# Altium PCB MCD_Board.PcbDoc (part 2 of 2)
Units mil, origin at the board's own origin, x right, y up, seen from the top; angles counter-clockwise.
Board outline 1574.8 x 1574.8 mil, 2 copper layers (Top Layer, Bottom Layer); 91 components, 65 nets, 283 pads, 76 vias.
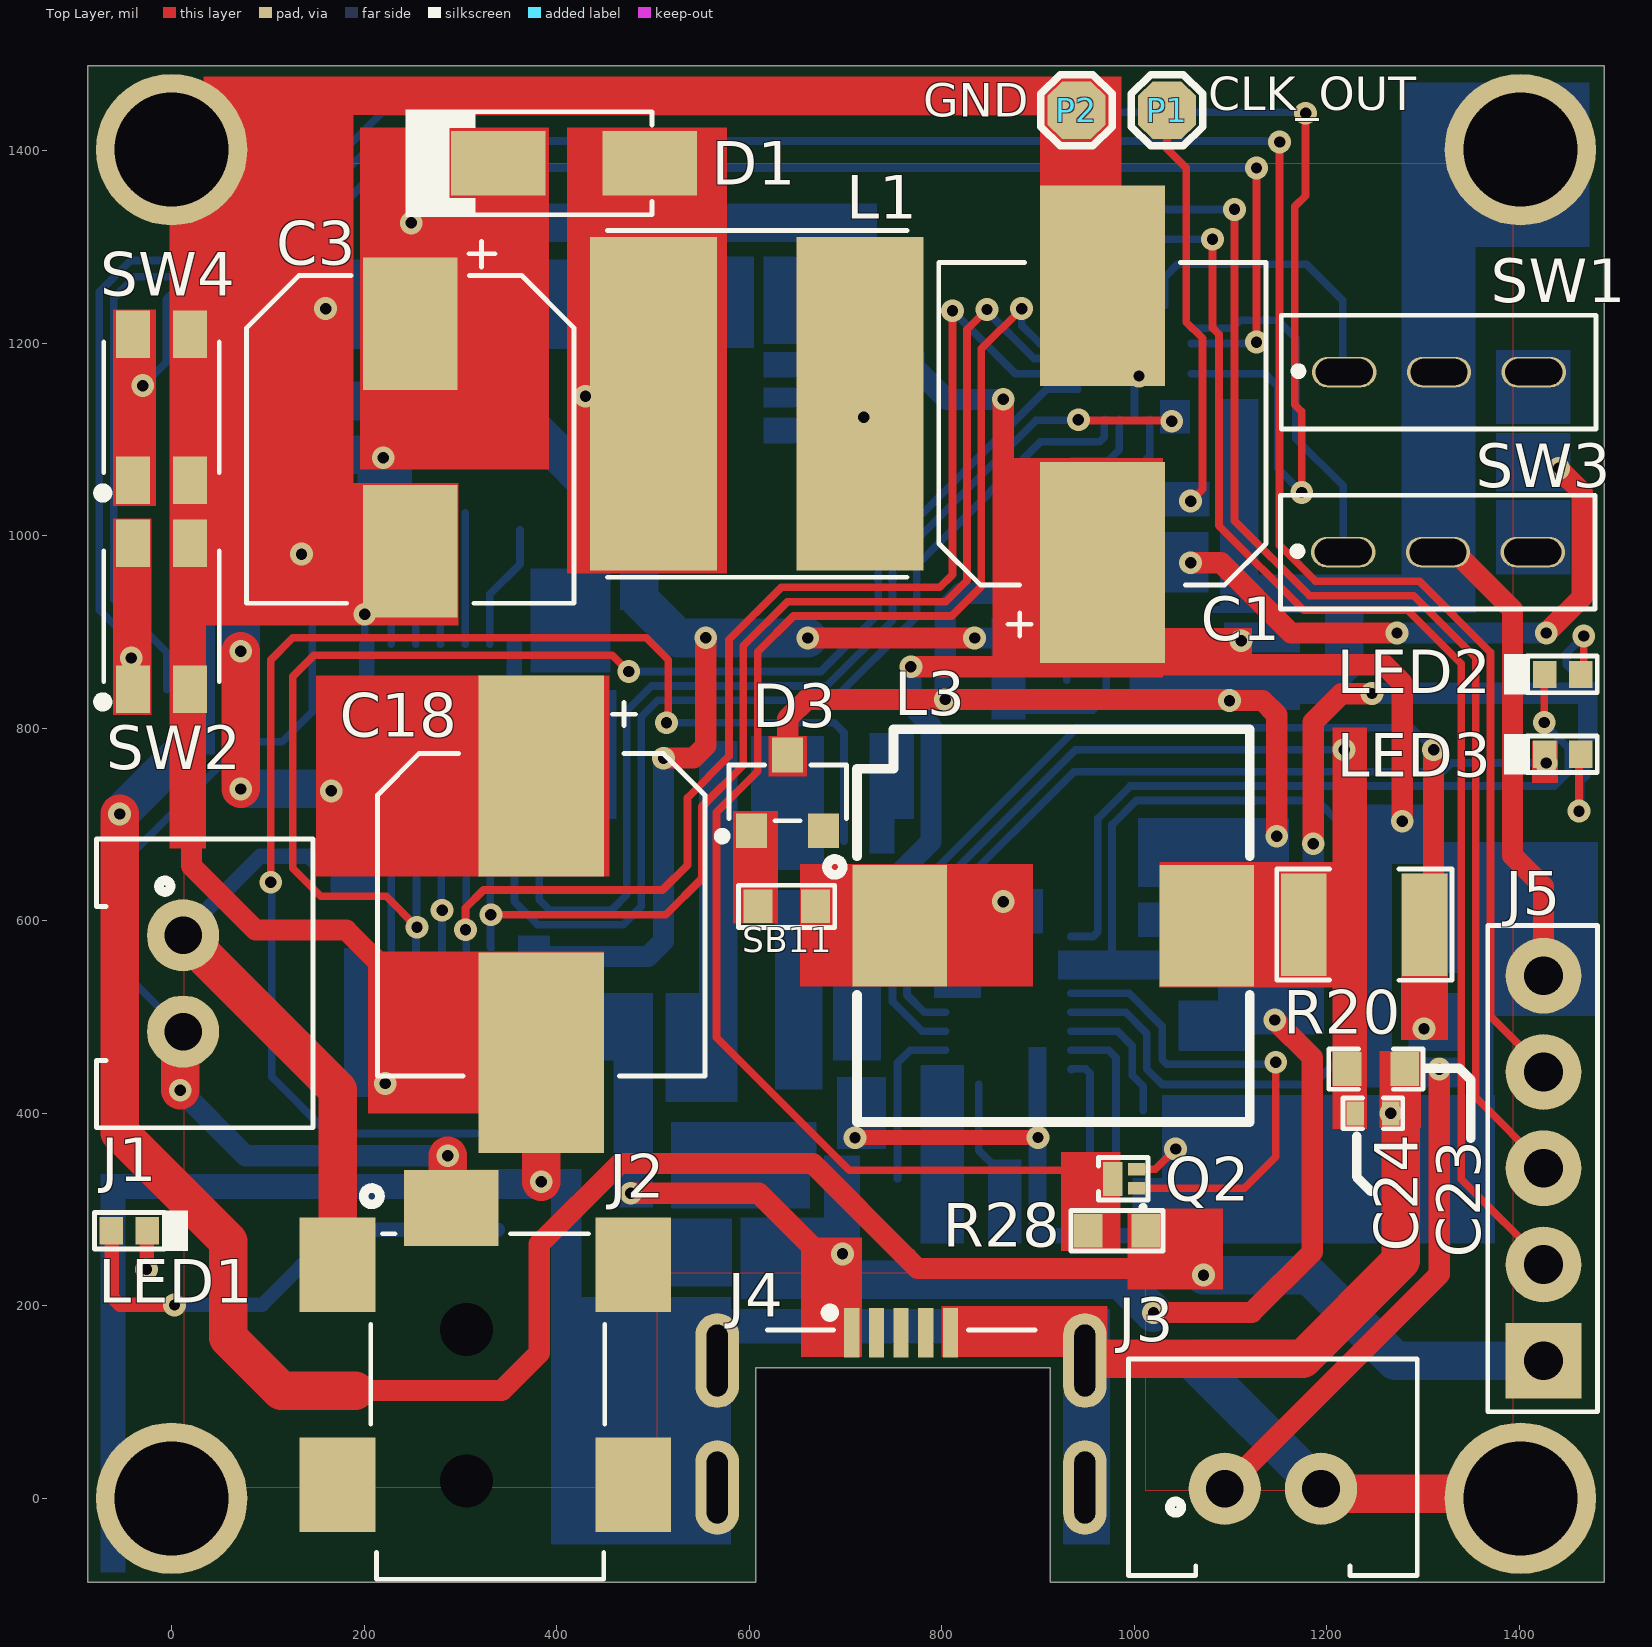
[diagram p0: Top Layer view]

## Part data (continued)
R10 R11: library part RC0402FR-071ML, "RES SMD 1M OHM 1% 1/16W 0402", Case Code (Imperial)=0402, Case Code (Metric)=1005, Manufacturer=Yageo, Max Operating Temperature=155°C, Min Operating Temperature=-55°C, Power Rating=63mW, Resistance=1MR, Supplier Part Number 1=311-1.00MLRCT-ND, Temperature Coefficient=100ppm/°C, Tolerance=1%, Voltage Rating=50V, Case/Package=0402, ComponentLink1Description=http://www.farnell.com/datasheets/1018594.pdf?src-supplier=Element14, ComponentLink1URL=http://www.farnell.com/datasheets/1018594.pdf?src-supplier=Element14, ComponentLink2Description=http://www.yageo.com/documents/recent/PYu-RC0402_51_RoHS_L_6_r.pdf?src-supplier=Future+Electronics, ComponentLink2URL=http://www.yageo.com/documents/recent/PYu-RC0402_51_RoHS_L_6_r.pdf?src-supplier=Future+Electronics, ComponentLink3Description=http://www.farnell.com/datasheets/2167052.pdf?src-supplier=Element14, ComponentLink3URL=http://www.farnell.com/datasheets/2167052.pdf?src-supplier=Element14, Composition="Thick Film", Depth=0.5mm, Height=0.32mm, Lead Free="Lead Free", Length=1mm, Manufacturer Part Number=RC0402FR-071ML, Military Standard=Not, Packaging="Tape and Reel", Pricing 1="1=0.1, 10=0.016, 100=0.0064, 1000=0.00289, 2500=0.00251, 5000=0.00207 (USD)", REACH SVHC=Unknown, Stock 1=3330803, Supplier 1=Digi-Key, Termination=SMD/SMT
R12: library part RC0402FR-072KL, "RES SMD 2K OHM 1% 1/16W 0402", Case Code (Imperial)=0402, Case Code (Metric)=1005, Manufacturer=Yageo, Max Operating Temperature=155°C, Max Power Dissipation=63mW, Min Operating Temperature=-55°C, Package Quantity=1, Resistance=2kR, Supplier Part Number 1=311-2KLRCT-ND, Temperature Coefficient=100ppm/°C, Tolerance=1%, Voltage Rating=50V, Case/Package=0402, ComponentLink1Description=http://www.yageo.com/documents/recent/PYu-RC_Group_51_RoHS_L_10.pdf?src-supplier=Digi-Key, ComponentLink1URL=http://www.yageo.com/documents/recent/PYu-RC_Group_51_RoHS_L_10.pdf?src-supplier=Digi-Key, ComponentLink2Description=http://documents.rs-components.com/techlib://itc_doclist_GB.htm?stockno=6186510&src-supplier=RSComponents, ComponentLink2URL=http://documents.rs-components.com/techlib://itc_doclist_GB.htm?stockno=6186510&src-supplier=RSComponents, ComponentLink3Description=https://www.verical.com/server-webapp/html/getDatasheet?partID=358921&src-supplier=Verical, ComponentLink3URL=https://www.verical.com/server-webapp/html/getDatasheet?partID=358921&src-supplier=Verical, ComponentLink4Description=http://www.mouser.com/ds/2/447/PYu-RC0402_51_RoHS_L_6_r-8721.pdf?src-supplier=Mouser, ComponentLink4URL=http://www.mouser.com/ds/2/447/PYu-RC0402_51_RoHS_L_6_r-8721.pdf?src-supplier=Mouser, ComponentLink5Description=http://www.farnell.com/datasheets/1018594.pdf?src-supplier=Element14, ComponentLink5URL=http://www.farnell.com/datasheets/1018594.pdf?src-supplier=Element14, ComponentLink6Description=http://www.farnell.com/datasheets/2167052.pdf?src-supplier=Element14, ComponentLink6URL=http://www.farnell.com/datasheets/2167052.pdf?src-supplier=Element14, Composition="Thick Film", Depth=0.5mm, Features="Moisture Resistant", Height=0.016inch, Lead Free="Lead Free", Length=1mm, Manufacturer Part Number=RC0402FR-072KL, Military Standard=Not, Number of Terminations=2, Packaging="Tape and Reel", Power Rating=63mW, Pricing 1="1=0.1, 10=0.016, 100=0.0064, 1000=0.00289, 2500=0.00251, 5000=0.00207 (USD)", REACH SVHC=Unknown, Stock 1=4877389, Supplier 1=Digi-Key, Termination=SMD/SMT, Voltage Rating (DC)=50V, Width=0.02inch, Working Voltage=50V
R13: library part AC0603DR-079K31L, "RES SMD  0603 9.31kOhm 0.5% Paper T/R", Manufacturer=Yageo, Category=Resistors, Manufacturer Part Number=AC0603DR-079K31L, Pricing 1="5000=0.00314, 10000=0.00309, 20000=0.00300 (USD)", RoHS=Yes, RoHS Compliant=Yes, Supplier 1=Avnet, Supplier Part Number 1=AC0603DR-079K31L
R14: library part RC0603FR-07442KL, "RES SMD 442000Ω ± 1.00% 0.1W ± 100ppm/℃ 0603", Case Code (Imperial)=0603, Case Code (Metric)=1608, Manufacturer=Yageo, Max Operating Temperature=155°C, Max Power Dissipation=100mW, Min Operating Temperature=-55°C, Package Quantity=1, Resistance=442kR, Resistor Type="Thick Film", Temperature Coefficient=100ppm/°C, Tolerance=1%, Voltage Rating=50V, Case/Package=0603, Category="Chip SMD Resistors", ComponentLink1Description=https://datasheet.ciiva.com/2455/pyu-r-int-thick-7-2455156.pdf?src-supplier=Digi-Key, ComponentLink1URL=https://datasheet.ciiva.com/2455/pyu-r-int-thick-7-2455156.pdf?src-supplier=Digi-Key, ComponentLink2Description=https://datasheet.ciiva.com/2455/pyu-r-int-thick-7-2455157.pdf?src-supplier=Digi-Key, ComponentLink2URL=https://datasheet.ciiva.com/2455/pyu-r-int-thick-7-2455157.pdf?src-supplier=Digi-Key, ComponentLink3Description=https://datasheet.ciiva.com/2455/pyu-r-int-thick-7-2455155.pdf?src-supplier=Digi-Key, ComponentLink3URL=https://datasheet.ciiva.com/2455/pyu-r-int-thick-7-2455155.pdf?src-supplier=Digi-Key, ComponentLink4Description=https://datasheet.ciiva.com/12558/rc0603-272842-12558427.pdf?src-supplier=Mouser, ComponentLink4URL=https://datasheet.ciiva.com/12558/rc0603-272842-12558427.pdf?src-supplier=Mouser, Construction=Rectangular, Depth=0.8mm, Features="Moisture Resistant", Height=0.022inch, Lead Free="Lead Free", Length=1.6mm, Manufacturer Part Number=RC0603FR-07442KL, Military Standard=Not, Number of Terminations=2, Packaging="Tape and Reel", Power Rating=100mW, Pricing 1="1=0.05220, 10=0.01890, 25=0.01870, 100=0.00820, 250=0.00770, 500=0.00760, 1000=0.00390 (USD)", RoHS=Yes, RoHS Compliant=Yes, Series=RC, Size Code=0603, Stock 1=1267, Supplier 1="Arrow Electronics", Supplier Part Number 1=RC0603FR-07442KL, Termination=SMD/SMT, Voltage Rating (DC)=50V, Width=0.031inch
R15 R16 R25 R27: library part RMCF0201FT1K50, "RES SMD 1.5K OHM 1% 1/20W 0201", Case Code (Imperial)=0201, Case Code (Metric)=0603, Manufacturer="Stackpole Electronics", Max Operating Temperature=125°C, Max Power Dissipation=50mW, Min Operating Temperature=-55°C, Resistance=1.5kR, Resistor Type="Thick Film", Supplier Part Number 1=RMCF0201FT1K50CT-ND, Temperature Coefficient=200ppm/°C, Tolerance=1%, Case/Package=0201, Category="Chip SMD Resistors", ComponentLink1Description=https://www.seielect.com/Catalog/SEI-RMCF_RMCP.pdf?src-supplier=Digi-Key, ComponentLink1URL=https://www.seielect.com/Catalog/SEI-RMCF_RMCP.pdf?src-supplier=Digi-Key, ComponentLink2Description=https://www.seielect.com/catalog/SEI-Packaging.pdf?src-supplier=Digi-Key, ComponentLink2URL=https://www.seielect.com/catalog/SEI-Packaging.pdf?src-supplier=Digi-Key, ComponentLink3Description=https://www.seielect.com/catalog/SEI-RMCF_RMCP.pdf?src-supplier=Avnet, ComponentLink3URL=https://www.seielect.com/catalog/SEI-RMCF_RMCP.pdf?src-supplier=Avnet, Contact Plating=Tin,Matte, Height=0.009inch, Length=0.024inch, Manufacturer Part Number=RMCF0201FT1K50, Mount="Surface Mount", Number of Terminations=2, Packaging="Tape and Reel", Pricing 1="1=0.10000, 10=0.02700, 100=0.01090, 1000=0.00488, 2500=0.00423, 5000=0.00350 (USD)", Radiation Hardening=No, RoHS=Yes, RoHS Compliant=Yes, Series=RMCF, Stock 1=151457, Supplier 1=Digi-Key, Width=0.012inch
R17: library part AC0603FR-075K1L, "Res Thick Film 0603 5.1K Ohm 1% 1/10W ±100ppm/°C Molded SMD Paper T/R", Case Code (Imperial)=0603, Case Code (Metric)=1608, Manufacturer=Yageo, Max Operating Temperature=155°C, Max Power Dissipation=100mW, Min Operating Temperature=-55°C, Resistance=5.1kR, Resistor Type="Thick Film", Supplier Part Number 1=1978087, Temperature Coefficient=100ppm/°C, Tolerance=1%, Voltage Rating=50V, Case/Package=0603, Category="Chip SMD Resistors", ComponentLink1Description=https://datasheet.ciiva.com/12577/pyu-ac-51-rohs-l-2-12577183.pdf?src-supplier=Mouser, ComponentLink1URL=https://datasheet.ciiva.com/12577/pyu-ac-51-rohs-l-2-12577183.pdf?src-supplier=Mouser, Features="Moisture Resistant,Automotive AEC-Q200", Height=0.022inch, Length=0.063inch, Manufacturer Part Number=AC0603FR-075K1L, Number of Terminations=2, Packaging="Tape and Reel", Power Rating=100mW, Pricing 1="500=0.00700, 2500=0.00700, 5000=0.00600, 7500=0.00600, 10000=0.00500 (GBP)", RoHS=Yes, RoHS Compliant=Yes, Series=AC, Stock 1=8000, Supplier 1=RSComponents, Termination=SMD/SMT, Weight=7.1E-05oz, Width=0.031inch
R18: library part RC0603FR-077K5L, "RES 7.5K OHM 1% 1/10W 0603", Case Code (Imperial)=0603, Case Code (Metric)=1608, Manufacturer=Yageo, Max Operating Temperature=155°C, Max Power Dissipation=100mW, Min Operating Temperature=-55°C, Package Quantity=1, Resistance=7.5kR, Resistance Tolerance=1%, Resistor Type="Thick Film", Supplier Part Number 1=68R0113, Temperature Coefficient=100ppm/°C, Voltage Rating=50V, Working Voltage=75V, Case/Package=0603, Category="Chip SMD Resistors", ComponentLink1Description=https://datasheet.ciiva.com/11808/0900766b80f96399-11808401.pdf?src-supplier=RSComponents, ComponentLink1URL=https://datasheet.ciiva.com/11808/0900766b80f96399-11808401.pdf?src-supplier=RSComponents, ComponentLink2Description=https://datasheet.ciiva.com/46395/443971-46395019.pdf?src-supplier=Element14, ComponentLink2URL=https://datasheet.ciiva.com/46395/443971-46395019.pdf?src-supplier=Element14, ComponentLink3Description=https://datasheet.ciiva.com/2519/pyu-r-int-thick-7-2519121.pdf?src-supplier=Digi-Key, ComponentLink3URL=https://datasheet.ciiva.com/2519/pyu-r-int-thick-7-2519121.pdf?src-supplier=Digi-Key, ComponentLink4Description=https://datasheet.ciiva.com/2519/pyu-r-int-thick-7-2519122.pdf?src-supplier=Digi-Key, ComponentLink4URL=https://datasheet.ciiva.com/2519/pyu-r-int-thick-7-2519122.pdf?src-supplier=Digi-Key, ComponentLink5Description=https://datasheet.ciiva.com/2519/pyu-r-int-thick-7-2519120.pdf?src-supplier=Digi-Key, ComponentLink5URL=https://datasheet.ciiva.com/2519/pyu-r-int-thick-7-2519120.pdf?src-supplier=Digi-Key, ComponentLink6Description=https://datasheet.ciiva.com/12555/rc0603-272842-12555256.pdf?src-supplier=Mouser, ComponentLink6URL=https://datasheet.ciiva.com/12555/rc0603-272842-12555256.pdf?src-supplier=Mouser, ComponentLink7Description=https://datasheet.ciiva.com/15189/getdatasheetpartid-326523-15189821.pdf?src-supplier=Verical, ComponentLink7URL=https://datasheet.ciiva.com/15189/getdatasheetpartid-326523-15189821.pdf?src-supplier=Verical, Construction=Rectangular, Depth=0.8mm, Features="Moisture Resistant", Height=0.45mm, Lead Free="Lead Free", Length=1.6mm, Manufacturer Part Number=RC0603FR-077K5L, Military Standard=Not, Number of Pins=2, Number of Terminations=2, Packaging="Tape and Reel", Power Rating=100mW, Pricing 1="1=0.10000, 25=0.01800, 50=0.01300, 100=0.00700 (USD)", REACH SVHC="No SVHC", RoHS=Yes, RoHS Compliant=Yes, Series=RC, Stock 1=2689, Supplier 1=Newark, Technology="THICK FILM", Termination=SMD/SMT, Tolerance=1%, Voltage Rating (DC)=50V, Width=0.031inch
R19 R28: library part AC0603JR-0710KL, "RES SMD 10K OHM 5% 1/10W 0603", Case Code (Imperial)=0603, Case Code (Metric)=1608, Manufacturer=Yageo, Max Operating Temperature=155°C, Max Power Dissipation=100mW, Min Operating Temperature=-55°C, Package Quantity=1, Resistance=10kR, Resistor Type="Thick Film", Supplier Part Number 1=1029044, Temperature Coefficient=100ppm/°C, Tolerance=5%, Voltage Rating=50V, Case/Package=0603, Category="Chip SMD Resistors", ComponentLink1Description=https://datasheet.ciiva.com/5562/pyu-ac-51-rohs-l-2-5562553.pdf?src-supplier=Mouser, ComponentLink1URL=https://datasheet.ciiva.com/5562/pyu-ac-51-rohs-l-2-5562553.pdf?src-supplier=Mouser, Construction=Rectangular, Depth=0.8mm, Features="Moisture Resistant,Automotive AEC-Q200,Anti-Sulfur", Height=0.022inch, Lead Free="Lead Free", Length=0.063inch, Manufacturer Part Number=AC0603JR-0710KL, Military Standard=Not, Number of Terminations=2, Packaging="Tape and Reel", Power Rating=100mW, Pricing 1="5000=0.00540 (USD)", RoHS=Yes, RoHS Compliant=Yes, Series=AC, Size Code=0603, Stock 1=1533000, Supplier 1="Future Electronics", Termination=SMD/SMT, Width=0.031inch
R20: library part CRH1210FR100P05Z, "RES SMD 660mW 0.1Ω 1210", Manufacturer="Ever Ohms Tech", Operating Temperature Range=-55℃~+155℃, Package=1210, Power(Watts)=660mW, Tolerance=±1%, Type="Thick Film Resistors"
R21: library part CR0402JF0472G, "4.7K ±5% 1/16W ±200ppm/°C 0402 Chip Resistor - Surface Mount RoHS", Manufacturer="LIZ Elec", Package=0402, Manufacturer Part No=CR0402JF0472G
R22 R23 R24 R26 R30: library part RK73B1ETTP103J, "RES 10K OHM 5% 1/10W 0402", Case Code (Imperial)=0402, Case Code (Metric)=1005, Manufacturer="KOA Speer", Max Operating Temperature=155°C, Min Operating Temperature=-55°C, Package Quantity=10000, Power Rating=63mW, Resistance=10kR, Supplier Part Number 1=2019-RK73B1ETTP103JCT-ND, Temperature Coefficient=200ppm/°C, Tolerance=5%, Voltage Rating=50V, Case/Package=0402, ComponentLink1Description=https://www.verical.com/server-webapp/html/getDatasheet?partID=89073&src-supplier=Verical, ComponentLink1URL=https://www.verical.com/server-webapp/html/getDatasheet?partID=89073&src-supplier=Verical, Composition="Thick Film", Depth=0.5mm, Height=0.35mm, Lead Free="Lead Free", Length=1mm, Manufacturer Part Number=RK73B1ETTP103J, Military Standard=Not, Mount="Surface Mount", Packaging="Tape and Reel", Pricing 1="1=0.1, 10=0.016, 100=0.0065, 1000=0.00292, 2500=0.00253, 5000=0.00209 (USD)", Stock 1=2917894, Supplier 1=Digi-Key, Termination=SMD/SMT, Voltage Rating (DC)=50V, Width=0.5mm
R29: library part RC0402JR-0720KL, "RES SMD 20K OHM 5% 1/16W 0402", Case Code (Imperial)=0402, Case Code (Metric)=1005, Manufacturer=Yageo, Max Operating Temperature=155°C, Max Power Dissipation=63mW, Min Operating Temperature=-55°C, Package Quantity=1, Power Rating=62.5mW, Resistance=20kR, Supplier Part Number 1=311-20KJRCT-ND, Temperature Coefficient=100ppm/°C, Tolerance=5%, Voltage Rating=50V, Case/Package=0402, ComponentLink1Description=http://www.yageo.com/documents/recent/PYu-RC_Group_51_RoHS_L_9.pdf?src-supplier=Digi-Key, ComponentLink1URL=http://www.yageo.com/documents/recent/PYu-RC_Group_51_RoHS_L_9.pdf?src-supplier=Digi-Key, ComponentLink2Description=http://www.farnell.com/datasheets/1018594.pdf?src-supplier=Element14, ComponentLink2URL=http://www.farnell.com/datasheets/1018594.pdf?src-supplier=Element14, ComponentLink3Description=http://www.mouser.com/ds/2/447/PYu-RC0402_51_RoHS_L_6_r-8721.pdf?src-supplier=Mouser, ComponentLink3URL=http://www.mouser.com/ds/2/447/PYu-RC0402_51_RoHS_L_6_r-8721.pdf?src-supplier=Mouser, ComponentLink4Description=http://www.yageo.com/documents/recent/PYu-RC0402_51_RoHS_L_6_r.pdf?src-supplier=Future+Electronics, ComponentLink4URL=http://www.yageo.com/documents/recent/PYu-RC0402_51_RoHS_L_6_r.pdf?src-supplier=Future+Electronics, Composition="Thick Film", Depth=0.5mm, Features="Moisture Resistant", Height=0.016inch, Lead Free="Lead Free", Length=0.039inch, Manufacturer Part Number=RC0402JR-0720KL, Military Standard=Not, Number of Pins=2, Number of Terminations=2, Packaging="Tape and Reel", Pricing 1="1=0.1, 10=0.013, 100=0.0053, 1000=0.00236, 2500=0.00205, 5000=0.00169 (USD)", REACH SVHC="No SVHC", Stock 1=4817510, Supplier 1=Digi-Key, Termination=SMD/SMT, Voltage Rating (DC)=50V, Width=0.02inch
R31: library part CRGH0603J100K, "RES SMD 100K OHM 5% 1/5W 0603", Case Code (Imperial)=0603, Case Code (Metric)=1608, Manufacturer="TE Connectivity", Max Operating Temperature=125°C, Min Operating Temperature=-55°C, Number of Resistors=1, Power Rating=200mW, Resistance=100kR, Resistance Tolerance=5%, Resistor Type="Thick Film,Power resistor", Supplier Part Number 1=A126393DKR-ND, Temperature Coefficient=100ppm/°C, Voltage Rating=50V, Case/Package=0603, ComponentLink1Description=http://www.farnell.com/datasheets/2007183.pdf?src-supplier=Element14, ComponentLink1URL=http://www.farnell.com/datasheets/2007183.pdf?src-supplier=Element14, Depth=0.8mm, ELV=Compliant, Height=0.45mm, Length=1.6mm, Manufacturer Part Number=CRGH0603J100K, Mount="Surface Mount", Number of Terminations=2, Packaging="Tape and Reel", Pricing 1="1=0.1, 10=0.049, 100=0.02, 1000=0.00899, 2500=0.0078 (USD)", REACH SVHC="No SVHC", RoHS Compliant=Yes, Series=CRGH, Stock 1=23277, Supplier 1=Digi-Key, Technology="THICK FILM", Termination=Solder, Tolerance=5%, Voltage Rating (DC)=50V, Width=0.8mm
SB1 SB2 SB3 SB4 SB5 SB6 SB7 SB8 SB9 SB10 SB11 SB12: "Solder Bridge ON"
SW1 SW3: "8.2mm 300mA 2.7mm 6V SPDT Micro Switch -25℃~+85℃ PCPin 9.9mm 100000 Plugin Microswitches ROHS", Manufacturer="XKB Connectivity", Manufacturer Part num=DS037-00P-60
SW2 SW4: "3mm 2mm Round Button 50mA Top3.65mm SPST 12V SMD Tactile Switches", Manufacturer=XKB, Package=Custom, ComponentLink1Description=LCSC, ComponentLink1URL=https://lcsc.com/product-detail/Tactile-Switches_XKB-Connectivity-TS-1185EC-C-D-B_C318893.html, Manufacturer Part No=TS-1185EC-C-D-B
U1: "IC REG BUCK BST ADJ 1.5A 8SON", Case/Package=SON, Manufacturer="Texas Instruments", Max Input Voltage=40V, Max Operating Temperature=85°C, Max Output Current=750mA, Min Input Voltage=3V, Min Operating Temperature=-40°C, Min Output Voltage=1.25V, Output Current=1.5A, Package Quantity=1, Quiescent Current=4mA, Supplier Part Number 1=595-MC33063ADRJR, Switching Frequency=100kHz, Category="Voltage Regulators - Switching", ComponentLink1Description=https://datasheet.ciiva.com/15113/getdatasheetpartid-174233-15113668.pdf?src-supplier=Verical, ComponentLink1URL=https://datasheet.ciiva.com/15113/getdatasheetpartid-174233-15113668.pdf?src-supplier=Verical, ComponentLink2Description=https://datasheet.ciiva.com/46382/1887492-46382423.pdf?src-supplier=Element14, ComponentLink2URL=https://datasheet.ciiva.com/46382/1887492-46382423.pdf?src-supplier=Element14, ComponentLink3Description=https://datasheet.ciiva.com/2029/mc33063a-2029334.pdf?src-supplier=Digi-Key, ComponentLink3URL=https://datasheet.ciiva.com/2029/mc33063a-2029334.pdf?src-supplier=Digi-Key, ComponentLink4Description=https://datasheet.ciiva.com/2029/mc33063a-2029335.pdf?src-supplier=Digi-Key, ComponentLink4URL=https://datasheet.ciiva.com/2029/mc33063a-2029335.pdf?src-supplier=Digi-Key, ComponentLink5Description=https://datasheet.ciiva.com/3218/mc33063a-3218541.pdf?src-supplier=Avnet, ComponentLink5URL=https://datasheet.ciiva.com/3218/mc33063a-3218541.pdf?src-supplier=Avnet, Height=0.75mm, Lead Free="Lead Free", Length=4.1mm, Manufacturer Part Number=MC33063ADRJR, Max Output Voltage=40V, Number of Outputs=1, Number of Pins=8, Output Type=Adjustable, Output Voltage=40V, Packaging="Tape and Reel", Pricing 1="1=0.80000, 10=0.70000, 50=0.70000, 100=0.53700, 250=0.49900, 1000=0.33900, 10000=0.33900 (USD)", Radiation Hardening=No, REACH SVHC="No SVHC", RoHS=Yes, RoHS Compliant=Yes, Series=-, Supplier 1=Mouser, Synchronous Rectifier=No, Topology=Flyback,SEPIC, Width=4.1mm
U3: "IC LI-ION LDO CHARGE MGMT 8SOIC", Battery Pack Voltage=8.4V, Case/Package=D, Manufacturer="Texas Instruments", Max Operating Temperature=70°C, Max Supply Voltage=15V, Min Input Voltage=4.5V, Min Operating Temperature=-20°C, Output Current=2A, Package Quantity=2500, Supplier Part Number 1=296-41202-1-ND, ComponentLink1Description=http://www.ti.com/lit/ds/symlink/bq2057c.pdf?src-supplier=Digi-Key, ComponentLink1URL=http://www.ti.com/lit/ds/symlink/bq2057c.pdf?src-supplier=Digi-Key, ComponentLink2Description=http://focus.ti.com/lit/ds/symlink/bq2057.pdf?src-supplier=Avnet+Europe, ComponentLink2URL=http://focus.ti.com/lit/ds/symlink/bq2057.pdf?src-supplier=Avnet+Europe, ComponentLink3Description=http://www.ti.com/general/docs/lit/getliterature.tsp?genericPartNumber=BQ2057W&&fileType=pdf&src-supplier=Avnet, ComponentLink3URL=http://www.ti.com/general/docs/lit/getliterature.tsp?genericPartNumber=BQ2057W&&fileType=pdf&src-supplier=Avnet, ComponentLink4Description=https://www.verical.com/server-webapp/html/getDatasheet?partID=613088&src-supplier=Verical, ComponentLink4URL=https://www.verical.com/server-webapp/html/getDatasheet?partID=613088&src-supplier=Verical, ComponentLink5Description=http://datasheet.iiic.cc/texas_instruments/BQ2057WSNTR.pdf?src-supplier=IIIC, ComponentLink5URL=http://datasheet.iiic.cc/texas_instruments/BQ2057WSNTR.pdf?src-supplier=IIIC, Contact Plating=Gold, Lead Free="Lead Free", Manufacturer Part Number=BQ2057WSNTR, Min Supply Voltage=4.5V, Number of Cells=2, Number of Pins=8, Output Voltage=8.4V, Packaging="Tape and Reel", Pricing 1="1=2.01, 10=1.802, 25=1.7, 100=1.36, 250=1.19, 500=1.156, 1000=0.918 (USD)", Radiation Hardening=No, Stock 1=9023, Supplier 1=Digi-Key, Weight=0.002677oz
U4: "IC BATT CHARGER LI-ION 20QFN", Case/Package=QFN, Manufacturer="Texas Instruments", Max Charge Current=2A, Max Operating Temperature=85°C, Max Supply Voltage=16V, Min Input Voltage=4.3V, Min Operating Temperature=-40°C, Min Supply Voltage=4.35V, Output Voltage=4.2V, Package Quantity=1, Supplier Part Number 1=595-BQ24103ARHLR, Switching Frequency=1.1MHz, Category="Battery Management", ComponentLink1Description=https://datasheet.ciiva.com/15114/getdatasheetpartid-165603-15114467.pdf?src-supplier=Verical, ComponentLink1URL=https://datasheet.ciiva.com/15114/getdatasheetpartid-165603-15114467.pdf?src-supplier=Verical, ComponentLink2Description=https://datasheet.ciiva.com/1136/1831046-1136638.pdf?src-supplier=Element14, ComponentLink2URL=https://datasheet.ciiva.com/1136/1831046-1136638.pdf?src-supplier=Element14, ComponentLink3Description=https://datasheet.ciiva.com/1136/1831046-1136637.pdf?src-supplier=Element14, ComponentLink3URL=https://datasheet.ciiva.com/1136/1831046-1136637.pdf?src-supplier=Element14, ComponentLink4Description=https://datasheet.ciiva.com/46404/1785919-46404762.pdf?src-supplier=Element14, ComponentLink4URL=https://datasheet.ciiva.com/46404/1785919-46404762.pdf?src-supplier=Element14, ComponentLink5Description=https://datasheet.ciiva.com/1932/bq24100-1932398.pdf?src-supplier=Digi-Key, ComponentLink5URL=https://datasheet.ciiva.com/1932/bq24100-1932398.pdf?src-supplier=Digi-Key, ComponentLink6Description=https://datasheet.ciiva.com/1932/bq24100-1932397.pdf?src-supplier=Digi-Key, ComponentLink6URL=https://datasheet.ciiva.com/1932/bq24100-1932397.pdf?src-supplier=Digi-Key, ComponentLink7Description=https://datasheet.ciiva.com/1932/bq24100-1932399.pdf?src-supplier=Digi-Key, ComponentLink7URL=https://datasheet.ciiva.com/1932/bq24100-1932399.pdf?src-supplier=Digi-Key, ComponentLink8Description=https://datasheet.ciiva.com/4873/slus606o-82020-4873407.pdf?src-supplier=Mouser, ComponentLink8URL=https://datasheet.ciiva.com/4873/slus606o-82020-4873407.pdf?src-supplier=Mouser, Contact Plating=Gold, Lead Free="Lead Free", Manufacturer Part Number=BQ24103ARHLR, Number of Cells=12, Number of Pins=20, Output Current=2A, Packaging="Tape and Reel", Pricing 1="1=5.70000, 10=5.13000, 25=4.85000, 50=4.85000, 100=4.20000, 250=3.99000, 500=3.58000, 1000=3.13000, 3000=3.12000, 10000=3.12000 (USD)", Radiation Hardening=No, REACH SVHC="No SVHC", RoHS=Yes, RoHS Compliant=Yes, Series=bqSWITCHER™, Supplier 1=Mouser, Weight=0.001668oz
U5: "IC MCU 8BIT 16KB FLASH 20VQFN", Case/Package=VQFN, Frequency=20MHz, Manufacturer=Microchip, Max Operating Temperature=105°C, Min Operating Temperature=-40°C, Supplier Part Number 1=ATTINY1616-MNRCT-ND, Category=Microcontrollers, ComponentLink1Description=http://www.microchip.com/mymicrochip/filehandler.aspx?ddocname=en606269&src-supplier=Digi-Key, ComponentLink1URL=http://www.microchip.com/mymicrochip/filehandler.aspx?ddocname=en606269&src-supplier=Digi-Key, Core Architecture=AVR, Interface=I2C,SPI,IrDA,UART,USART, Manufacturer Part Number=ATTINY1616-MNR, Memory Size=16KB, Memory Type=FLASH, Number of I/Os=18, Oscillator Type=Internal, Packaging="Cut Tape", Peripherals="Brown-out Detect/Reset,POR,PWM,WDT", Pricing 1="1=0.75000, 25=0.69000, 100=0.62000 (USD)", RoHS=No, Stock 1=3963, Supplier 1=Digi-Key
U6: "IC MOTOR DRIVER DC 5.5V 16HTSSOP", Manufacturer="Texas Instruments", Supplier Part Number 1=296-53515-6-ND, Category="Motor Drivers", Manufacturer Part Number=DRV8876PWPR, Pricing 1="1=2.40000, 10=2.15700, 25=2.03520, 100=1.73400, 250=1.62816, 500=1.42464, 1000=1.34400 (USD)", RoHS=Yes, Supplier 1=Digi-Key
U7: "Buck Switching Regulator IC Positive Fixed 3.3V 1 Output 1A 8-WFDFN Exposed Pad", Case/Package=SOIC, Manufacturer="Texas Instruments", Max Input Voltage=17V, Max Operating Temperature=125°C, Max Output Current=1A, Max Output Voltage=3.3V, Min Input Voltage=3V, Min Operating Temperature=-40°C, Package Quantity=3000, Quiescent Current=17uA, Supplier Part Number 1=595-TPS62162DSGR, Switching Frequency=2.25MHz, Category="Voltage Regulators - Switching", ComponentLink1Description=https://datasheet.ciiva.com/2034/tps62161-2034675.pdf?src-supplier=Digi-Key, ComponentLink1URL=https://datasheet.ciiva.com/2034/tps62161-2034675.pdf?src-supplier=Digi-Key, Contact Plating=Gold, Lead Free="Lead Free", Manufacturer Part Number=TPS62162DSGR, Min Output Voltage=3.3V, Number of Outputs=1, Number of Pins=8, Operating Supply Voltage=17V, Output Configuration=Positive, Output Current=1A, Output Type=Fixed, Output Voltage=3.3V, Packaging="Tape and Reel", Pricing 1="1=1.59000, 10=1.44000, 25=1.36000, 50=1.36000, 100=1.16000, 250=1.09000, 500=0.94700, 1000=0.78500, 10000=0.78400 (USD)", Radiation Hardening=No, RoHS=Yes, RoHS Compliant=Yes, Series=DCS-Control™, Supplier 1=Mouser, Synchronous Rectifier=Yes

## Free pads (board coordinates)
  round 157.48 hole 118.11: 1(0,1401.2) 2(1401.2,1401.2) 3(1401.2,0) 4(0,0)

## Via types
v1: diameter 23.62, hole 11.81, Top Layer to Bottom Layer, tented both sides, 76 vias

## Nets (pads, with @x,y where several pads share a name; then routed paths per layer and width w, separated by ;. In a path a pad name is that pad's centre, name@x,y a point inside that pad or via, vN(x,y) a via of type N, cw(c..) or ccw(c..) an arc to the next point about the centre after c; other vN are vias at no path point)
24V: C3.1 C18.1 C20.1 C21.1 D1.1 R3.1 U6.11 | length 1125.7
  Top Layer w40: v1(72,737) v1(72,880) ; C3.1@247.74,1236.11 C3.1@249.74,1238.11
  Bottom Layer w8: C21.1@240.5,977 243.22,974.28 243.22,939.78 253.81,929.19 U6.11
  Bottom Layer w40: v1(72,737) v1@164,737 ; v1(72,880) 72,1060.57 95.43,1084 217,1084 v1(220,1081) ; v1(249,1325) R3.1@702,1325
  other v1: 166,735
\P\G\: Q2.3 R28.1 U5.9 | length 1531.7
  Top Layer w8: v1(883,1236) 841.19,1194.19 841.19,947.28 810.53,916.62 646.05,916.62 609,879.57 609,755.56 566,712.56 566,479.11 704.11,341 928,341 955,314 955,308.5
  Bottom Layer w8: v1@881,1236 883.11,1233.89 883.11,1218.43 901.74,1199.8 U5.9
\P\G\#: Q2.1 R27.2 U4.5 | length 520.9
  Top Layer w8: Q2.1 1114.16,322.16 1147,355 v1(1147,453)
  Bottom Layer w8: U4.5 994.7,524.69 1029.17,490.21 1029.17,455.67 1033.86,450.99 1144.99,450.99 v1(1147,453)
B_IN1: U5.1 U6.1 | length 1065.7
  Top Layer w8: v1(942,1120.5) 942.75,1119.75 1038.25,1119.75 v1(1039,1119)
  Bottom Layer w8: U6.1 382.01,658.58 382.01,621.99 393,611 457,611 473,627 473,818.09 498.91,844 680.79,844 749,912.21 749,970.95 898.05,1120 941.5,1120 v1(942,1120.5) ; U5.1@1031.75,1121 1031.75,1119.06 1038.94,1119.06 v1(1039,1119)
B_IN2: U5.5 U6.2 | length 1036.4
  Bottom Layer w8: U6.2 356.17,620.06 380.24,596 469,596 488,615 488,811.88 505.12,829 687,829 774.19,916.19 774.19,969.19 850,1045 850,1045.56 856.44,1052 857,1052 902.69,1097.69 964.07,1097.69 968.76,1102.37 U5.5@968.76,1121
BAT#: R20.2 SB10.1 U4.14 | length 976.9
  Top Layer w22: R20.2@1301.5,562.5 R20.2@1315,576 ; R20.2@1301.5,596.49 R20.2 ; v1(1311,777.81) 1311,638 R20.2@1315,634
  Bottom Layer w8: U4.14 779.68,485.32 749,516 749,608.98 940.64,800.62 1288.19,800.62 v1(1311,777.81)
  other v1: 1301,488
CC_: R9.2 U3.7 | length 1491.5
  Top Layer w8: v1(103,640.1) 103,871 126,894 493,894 515.81,871.19 515.81,807.43 v1(514.19,805.81)
  Bottom Layer w8: v1(103,640.1) 104,639.1 104,438 163,379 U3.7 ; v1(514.19,805.81) 688.19,805.81 698.5,795.5 R9.2
CHG: LED1.1 U3.5 | length 505.4
  Top Layer w15: LED1.1 -62.35,277.65 -62.35,209.79 -53.56,201 v1(3,201)
  Bottom Layer w15: v1(3,201) 94,201 172,279 U3.5
CII#: R3.2 R4.2 U1.5
CLK_OUT: P1.1 SB12.2 | length 426.5
  Top Layer w8: P1.1 1034,1402 1054,1382 1054,1222.01 1071,1205.01 1071,1048.5 1058.57,1036.06 v1(1058.57,1036)
GND: C1.2 C2.1 C3.2 C7.2 C8.2 C9.2 C10.2 C11.2 C12.2 C13.1 C14.2 C15.2 C16.2 C17.2 C18.2 C20.2 C22.2 C23.1 C24.1 C25.2 C26.2 D3.3 J3.2 J4.5 J4.MH1 J4.MH2 J4.MH3 J4.MH4 J5.5 P2.1 pad.1 pad.2 pad.3 pad.4 Q2.2 R4.1 R11.2 R12.2 R14.1 R17.2 R18.2 R25.1 R29.1 SB8.2 SW1.2 SW2.2 SW3.2 SW4.2 U1.2 U1.4 U1.9 U3.6 U4.10 U4.16 U4.17 U4.18 U4.21 U5.3 U5.21 U6.9 U6.15 U6.17 U7.1 U7.4 U7.5 U7.9 | length 4007.5
  Top Layer w8: Q2.2 1021.84,341.84 v1(1043,363)
  Top Layer w16: v1(710,374.81) 710.09,374.91 899.91,374.91 v1(900,375)
  Top Layer w22: 19,702.43 20.83,700.59 20.83,657.17 87.39,590.61 181.39,590.61 224,548 ; D3.3@640,774.34 D3.3 640,810 659.9,829.9 1097.48,829.9 1098.56,828.81 1133.3,828.81 1148,814.11 v1(1148,688) ; SW3.2 1333.29,983 1393,923.29 1393,667.78 1425.2,635.58 J5.5
  Top Layer w40: 224,548 288,484 C18.2@326.5,484 ; v1(384,329) C18.2 ; D3.3@640,771 D3.3@640,772 ; J4.MH4@948.94,145.26 1175.26,145.26 1277,247 1277,419 ; J3.2 1199,5 1396.2,5 pad.3
  Bottom Layer w8: v1(200.63,918.37) 200.63,889.18 U6.9 ; U6.17@202.63,835.93 265.56,773 U6.17 ; U1.9@544.46,1142 U1.9 ; U5.3@1000.25,1121 U5.21@1000.25,1166 ; 1151.19,646.19 1156,651
  Bottom Layer w12: U1.2 U1.9@544.46,1142
  Bottom Layer w16: U6.17@202.63,835.93 U6.9 ; U6.17@356.17,835.93 U6.15
  Bottom Layer w22: v1(803.76,829.9) 803.76,924.1 819.89,940.23 860.11,940.23 873,953.12 C15.2@873,984.5 ; U5.21@1000.25,1180.06 1005,1175.31 v1(1005,1166)
  Bottom Layer w40: v1@159,1236 v1(160,1236) ; U6.17 339.13,819.93 U6.17@356.17,819.93 ; U6.17@356.17,819 U6.17@357.1,819.93 ; 407,1267 510,1267 536,1241 ; J4.MH4@948.94,145.26 1058.74,145.26 J3.2 ; C25.2@1165,845 1194.57,845 1218,868.43 1218,940 1221.79,940
  other v1: 1266.5,400 222,431 1099,828.81 135,981
IMODE: R29.2 U6.7 | length 99.8
  Bottom Layer w8: R29.2@228.22,559 U6.7
"IPK SNS#": L1.2 R1.1 R2.1 U1.7
  other v1: 719,1123
L_SW1: SW1.1 U5.15 | length 311.4
  Bottom Layer w8: U5.15@1031.75,1239.11 1031.75,1268.75 1045,1282 1179,1282 1216.61,1244.39 1216.61,1171.4 1216.74,1170.93 1216.74,1170 SW1.1
L_SW2: SW3.1 U5.16 | length 362.4
  Bottom Layer w8: U5.16 1101.53,1215.55 1109.98,1224 1149,1224 1168,1205 1168,1101 1217.15,1051.85 SW3.1
NetC2_2: C2.2 U1.3 | length 70.4
  Bottom Layer w12: C2.2 441,1183 450.5,1173.5 U1.3
NetC8_1: C8.1 SB3.2
NetC13_2: C13.2 U4.7 | length 142.1
  Bottom Layer w8: U4.7 982.68,485.32 998,470 998,439.79 1009.5,428.29 C13.2
NetC14_1: C14.1 C22.1 SB9.2
NetC19_1: C19.1 U6.13 | length 136.8
  Bottom Layer w8: U6.13 C19.1@304.99,1024
NetC19_2: C19.2 U6.14 | length 131.8
  Bottom Layer w8: U6.14 330.58,939.14 362,970.56 362,1006
NetC21_2: C21.2 U6.12 | length 89.9
  Bottom Layer w8: C21.2@279.2,977 279.2,887.37 U6.12
NetD1_2: D1.2 L1.1 U1.1 | length 80
  Bottom Layer w8: U1.1@484.17,1110.25 U1.1@484.43,1110.5
  Bottom Layer w12: v1(430,1145) 432.22,1142.78 432.22,1123.92 445.9,1110.25 U1.1@484.17,1110.25
NetD3_1: D3.1 SB11.2
NetL4_2: L4.2 U5.4 | length 108.3
  Bottom Layer w8: L4.2 929,1072 935,1078 973,1078 984.5,1089.5 U5.4@984.5,1121
NetL5_1: L5.1 U7.7 | length 65.4
  Bottom Layer w8: L5.1 964,905 U7.7
NetLED1_2: LED1.2 R12.1 | length 79.6
  Top Layer w15: v1@-25.5,238 LED1.2@-25.5,278
  Bottom Layer w15: R12.1@-26.75,277.25 -26.25,276.75 -26.25,238.25 v1(-26,238)
NetLED2_1: LED2.1 R15.1 | length 101.6
  Top Layer w8: LED2.1 1467.08,859.48 v1(1467.08,895.92)
  Bottom Layer w8: v1(1467.08,895.92) 1449,877.84 1449,866.07 1453.69,861.39 R15.1
NetLED3_1: LED3.1 R16.1 | length 122.8
  Top Layer w8: v1(1462,714) 1462,771.4 LED3.1
  Bottom Layer w8: v1(1462,714) 1463.99,715.99 1463.99,744.8 1470,750.81 R16.1
NetQ1_1: Q1.1 R9.1
NetQ1_2: Q1.2 SB1.1
NetR1_2: R1.2 U1.8
NetR17_1: R17.1 U4.8 | length 149.2
  Bottom Layer w8: U4.8 973.37,465.63 981,458 R17.1
NetR18_1: R18.1 U4.9 | length 154.8
  Bottom Layer w8: U4.9 U4.9@934.72,445.22 ; U4.9@934.72,446.22 949.31,446.22 954,441.53 ; R18.1 954,440.53
NetR19_1: R19.1 U4.13 | length 175.9
  Bottom Layer w8: R19.1 754,452.31 767.32,465.63 U4.13
NetR22_1: R22.1 SW1.3
NetR23_1: R23.1 SW3.3
NetR31_1: R31.1 U7.8 | length 199.9
  Bottom Layer w8: R31.1 930,877 909,898 909,912.88 926.12,930 998,930 1003.32,924.68 U7.8
NetSB2_2: SB2.2 U3.3
NetSB4_2: SB4.2 U3.2
NetSB5_2: SB5.2 U3.8
NetSB6_2: SB6.2 U4.3 U4.4 U4.6 | length 993.2
  Bottom Layer w8: U4.6 991,505 1013,483 1013,446 1029,430 1186,430 1211,455 1211,704 1190,725 1002,725 977,700 977,565 988,554 988.5,554
NetSB12_1: SB12.1 U5.2 | length 121.6
  Bottom Layer w8: SB12.1@966,1035 965,1036 965,1056 971,1062 995,1062 1016,1083 U5.2@1016,1121
nFAULT: R30.2 U5.7 U6.4 | length 1342.2
  Top Layer w8: v1(305.28,590.83) 305.28,613.28 324,632 510,632 536,658 536,728 579,771 579,892 633.62,946.62 798.11,946.62 811.19,959.7 v1(811.19,1233.81)
  Bottom Layer w8: U6.4 306.25,657.57 v1@306.25,589.87 ; v1(305.28,590.83) v1@306.25,589.87 ; R30.2 306.25,535.25 v1@306.25,589.87 ; v1(811.19,1233.81) 876.7,1168.31 U5.7
nSLEEP: R26.2 U5.8 U6.3 | length 1249.1
  Top Layer w8: v1(331.73,606.26) 513.26,606.26 551,644 551,718.77 594,761.77 594,885.79 639.83,931.62 804.32,931.62 826.19,953.49 826.19,1214.19 v1(847,1235)
  Bottom Layer w8: U6.3 331.16,658.25 331.16,606.83 v1(331.73,606.26) ; v1@331.29,606 331.29,572.71 R26.2 ; v1@846,1235 846,1234.05 896,1184.06 U5.8
OUT_1: J1.1 J2.1 U6.8 | length 637.9
  Top Layer w40: J1.1 172.46,424.54 J2.1
  Bottom Layer w16: J1.1 12,587.02 91.89,666.91 142.79,666.91 150.88,658.83 U6.8
OUT_2: J1.2 J2.3 U6.10 | length 1144.1
  Top Layer w40: v1(9,424) 9,482 J1.2 ; v1(287,356) 287,305.27 J2.3
  Bottom Layer w8: J1.2 -43,540 -43,668 75,786 115,786 146,817 146,928 171,953 218,953 228.22,942.78 U6.10
  Bottom Layer w22: v1(9,424) 77,356 v1(287,356)
PMODE: SB7.1 SB8.1 U6.16
RESET: C17.1 R21.1 SW2.1 U5.19 | length 2375
  Top Layer w8: v1(1174.01,1044.99) 1174.01,1129 1166.81,1136.2 1166.81,1342 1178,1353.19 v1(1178,1439)
  Bottom Layer w8: R21.1 v1(-42,873) -42,890 -75,923 -75,1253.21 -42.21,1286 65,1286 219,1440 1177,1440 v1(1178,1439) ; U5.19 1135.89,1168.31 1149,1155.2 1149,1070 v1(1174.01,1044.99)
RESET#: J5.4 R21.2 | length 2852.8
  Top Layer w8: v1(1151,1409) 1151,990 1188.38,952.62 1296.38,952.62 1370,879 1370,501.2 J5.4@1428.2,443
  Bottom Layer w8: R21.2 -5,879 -60,934 -60,1247 -38,1269 71,1269 212,1410 1150,1410 v1(1151,1409)
RXD: J5.3 U5.11 | length 1410.5
  Top Layer w8: v1(1104.19,1339) 1104.19,1015.6 1182.16,937.62 1290.16,937.62 1354.62,873.16 1354.62,416.57 J5.3@1428.2,343
  Bottom Layer w8: U5.11@968.76,1239.11 968.76,1307.76 1000,1339 v1(1104.19,1339)
SNS: L3.1 SB11.1 U4.1 U4.20
  other v1: 864,620
SNS#: C23.2 C24.2 L3.2 R20.1 U4.15 | length 653.8
  Bottom Layer w8: U4.15 782,505 764,523 764,602.77 939.04,777.81 v1(1218,777.81)
SNS_: Q1.3 R8.1 U3.1
STAT1: LED2.2 U4.2 | length 768.4
  Top Layer w8: v1(1426,805.98) 1426,855.8 LED2.2
  Bottom Layer w8: U4.2 957.31,583.74 962,588.43 962,706.21 995.79,740 1436.26,740 1450.81,754.55 1450.81,779.98 1426,804.79 v1(1426,805.98)
STAT2: LED3.2 U4.19 | length 747.4
  Top Layer w8: LED3.2 1428,771.2 v1(1428,764)
  Bottom Layer w8: U4.19 797.02,583.74 796.3,584.46 807,584.46 807,624.56 937.44,755 1320.45,755 1329.45,764 v1(1428,764)
SW3: R24.1 SW4.1 U5.17 | length 1537.7
  Top Layer w8: v1(1127,1201.19) v1(1127,1382)
  Bottom Layer w8: v1(-29.81,1156) -5.5,1180.31 -5.5,1245.5 3,1254 88,1254 216,1382 v1(1127,1382) ; U5.17 1125.61,1199.8 v1(1127,1201.19)
TS#: R13.1 R14.2 U4.12
TS_: R10.1 R11.1 U3.4
TXD: J5.2 U5.12 | length 1426.3
  Top Layer w8: v1(1081.38,1308) 1081.38,1215.85 1088,1209.23 1088,1010.57 1175.95,922.62 1283.95,922.62 1339.62,866.95 1339.62,331.57 1359,312.2 1383.64,287.55 ccw(c1420.39,322) 1385.94,285.25 J5.2@1428.2,243
  Bottom Layer w8: U5.12@984.5,1239.11 984.5,1288.5 1004,1308 v1(1081.38,1308)
VBAT: C1.1 C25.1 J3.1 R2.2 SB1.2 SB3.1 SB4.1 SB9.1 SB10.2 U1.6 U7.2 U7.3 | length 1859.7
  Top Layer w22: v1(768,864) 867.08,864 ; 864,1059.81 v1(864,1141.7) ; C1.1@905.9,881.79 905.9,891.53 C1.1@905.16,911.94 ; C1.1@946.52,964.01 C1.1@905.16,911.94 ; C1.1@981.32,1007.82 941.5,968 C1.1@924.66,984.84 ; J3.1 1316.81,232.81 v1(1316.81,446) ; 1108,866 1259.35,866 1278.5,846.85 v1(1278.5,703.5) ; C1.1@903.99,944.32 903.05,969.98 901.68,1007.82 C1.1@924.66,984.84 ; C1.1@903.99,944.32 C1.1@905.16,911.94 ; C1.1@903.99,944.32 C1.1@924.66,984.84
  Top Layer w40: C1.1@964,973.3 C1.1@968,969.3
  Bottom Layer w22: SB1.2 719,611 753,645 753,646.54 789,682.54 789,802.46 778.46,813 779.2,813 768,824.2 v1(768,864) ; 771,1176 771,1175.5 771.5,1175.5 805.3,1141.7 v1(864,1141.7)
  other v1: 1111,891
VCC_3V3: C15.1 C16.1 C26.1 J5.1 L4.1 L5.2 R22.2 R23.2 R24.2 R26.1 R28.2 R30.1 R31.2 SB7.2 U6.5 U7.6 | length 4931.8
  Top Layer w22: 191,112 343,112 382,151 382,264.16 465.84,348 666,348 764.04,249.96 775,239 1007,239 1008,238 ; v1(511,769) 511.31,769.31 542.11,769.31 555,782.2 v1(555,894) ; v1(661,893.81) 721.05,893.81 780.35,893.81 833.44,893.81 v1(834.19,893.81) ; v1(1058.57,972) 1090,972 1163,899 v1(1273,899) ; v1(1428,899) 1465.46,936.46 1465.46,1045.1 1441,1069.56 v1(1441,1070)
  Top Layer w40: v1(-54,711) -54,380 59,267 59,167 114,112 191,112
  Bottom Layer w8: U6.5 280.2,658.03 280.2,611.8 v1(281,611) 281,520 293,508 350,508 ; R31.2@869.5,862 R31.2@875.75,855.75 ; R31.2 870.81,849.19 870.81,825.19 877,819 957,819 971,833 971,877 979.31,885.31 U7.6
  Bottom Layer w22: 384,563 495,563 511,579 v1(511,769) ; v1(834.19,893.81) 870,893.81 ; R31.2 870,862 870,893.81 ; 926,955 912,955 909,952 909,948.11 870,909.11 870,893.81 ; v1(1273,899) v1(1428,899) ; v1@1440,1068 1440,1069 v1(1441,1070)
  Bottom Layer w40: v1(-54,711) 22.24,787.24 ; 33,1140 347,1140 486,1001 SB7.2 486,934 526.19,893.81 v1(661,893.81) ; v1(1072,232) 1182,232 1271,143 J5.1@1428.2,143
VPROP: R25.2 U5.6 U6.6 | length 1507
  Top Layer w8: v1(254.93,593.39) 222.81,625.5 154.94,625.5 125.81,654.63 125.81,853.81 148,876 457.81,876 v1(474.81,859)
  Bottom Layer w8: R25.2@219.65,525 R25.2 248,525 253.91,530.91 v1@253.91,594 ; U6.6 254.37,658.27 254.37,593.94 v1(254.93,593.39) ; v1(474.81,859) 674.57,859 734,918.43 734,977.16 909.4,1152.56 U5.6
VTSB: C10.1 R13.2 U4.11 | length 96.4
  Bottom Layer w8: U4.11 838.53,361.47 856,344 856,341
VUSB: C7.1 C9.1 C11.1 C12.1 J4.1 R8.2 R10.2 R15.2 R16.2 R19.2 R27.1 SB2.1 SB5.1 SB6.1 | length 1565.9
  Top Layer w22: v1(477,317) 610,317 663,264 ; v1(1020,193) 1122,193 1185,256 1185,458 v1(1146,497) ; v1(1185.98,680) 1186,806.46 1215.42,835.88 1246.69,835.88 v1(1247,836.19)
  Bottom Layer w22: 1142,550.5 1185.98,594.48 v1(1185.98,680) ; v1(1247,836.19) 1247.31,836.5 R15.2@1470,836.5
  Bottom Layer w40: 695,227 986,227 v1(1020,193)
  other v1: 697,254
pads on no net: D3.2 J2.2 J2.4 J2.5 J2.7 J2.8 J4.2 J4.3 J4.4 Q1.4 U5.10 U5.13 U5.14 U5.18 U5.20

## Polygon pours and split planes (outlines as drawn)
GND on Top Layer "Polygon_1" (solid, remove dead copper, shelved, pour order 0): 13,1387 1393,1387 1393,8 1012,8 1012,234 504,234 504,12 504,11 13,11
GND on Bottom Layer "Polygon_2" (solid, remove dead copper, shelved, pour order 1): 13,1387 1393,1387 1393,8 1012,8 1012,234 504,234 504,12 504,11 13,11

## Other copper
Top Layer:
  rectangle net GND: 902,1330 987,1442
  rectangle net GND: 157,1437 987,1477
  rectangle net GND: 33,1043 189,1477
  rectangle net VCC_3V3: 993,217 1092,301
  rectangle net VUSB: 654,147 717,271
  rectangle net STAT2: 1413,743 1440,787
  rectangle net VBAT: 1018,855 1122.5,904
  rectangle net VBAT: 853,853 1030,1081
  rectangle net 24V: 150,646 455,855
  rectangle net GND: 204,400 449,568
  rectangle net GND: 1,907 298,1055
  rectangle net BAT#: 1277,476 1326,649
  rectangle net GND: -1.94,675 36,1367
  rectangle net RESET: -61,814 -21,1018
  rectangle net SW3: -61,1031 -16,1235
  rectangle net GND: 1255,385 1298,465
  rectangle net GND: 800,147 972,200
  rectangle net GND: 620,750 660,792
  rectangle net NetD1_2: 411,961 577,1424
  rectangle net NetD3_1: 583,597 630,714
  rectangle net SNS: 653,532 895,659
  rectangle net 24V: 196,1069 392,1424
  rectangle net SNS#: 1206,384 1242,801
  rectangle net SNS#: 1026,531 1212,661
  rectangle net \P\G\: 924,257 986,360
  pour cut-out: 434,1318 434,951 789,951 790,952 790,1318 435,1318
  pour cut-out: 676.5,808.5 677.5,808.5 675,384 1128,384 1129,385 1129,808.5
Bottom Layer:
  rectangle net B_IN1: 1027,1106 1058,1141
  rectangle net GND: 1334,1300 1473,1471
  rectangle net GND: 141,1194 414,1287
  rectangle net NetQ1_1: 725,670 751,795
  rectangle net NetQ1_1: 748.55,706 771,795
  rectangle net STAT2: 782,579 818,604
  rectangle net VCC_3V3: 13,773 45,1233
  rectangle net GND: 1077,920 1102.8,927
  rectangle net VUSB: 1461,787 1481,848
  rectangle net VBAT: 1260,659 1305,721
  rectangle net VBAT: 627,425 676,632
  rectangle net NetC8_1: 687,455 737,543
  rectangle net SNS_: 513,412 588,525
  rectangle net VUSB: 678,279 715,356
  rectangle net GND: 691,363 742,438
  rectangle net TS#: 778,265 823,450
  rectangle net GND: 121,964 181,1002
  rectangle net GND: 1089,920 1354.57,960
  rectangle net GND: 1277.57,920 1354.57,1471
  region net VCC_3V3: 1453,1107 1376,1107 1376,1046 1453,1046
  region net NetR23_1: 1453,1037 1376,1037 1376,960 1453,960
  rectangle net NetR22_1: 1376,1116 1453,1193
  rectangle net BAT#: 1285,465 1342,525
  rectangle net GND: -74,-77 -48,337
  rectangle net GND: 308,322 426,342
  rectangle net VCC_3V3: 466,923 506,945
  rectangle net GND: 179,417 242,443
  rectangle net GND: 179,417 204,572
  rectangle net OUT_1: 165,628 212,689
  rectangle net GND: 1355,404 1373,514
  rectangle net VUSB: 1087,482 1197,619
  rectangle net VCC_3V3: 852,809 887,915
  rectangle net GND: 995,819 1172,871
  rectangle net VBAT: 1093,879 1172,910
  rectangle net CLK_OUT: 1010,1020 1078,1056
  rectangle net GND: 861,973 886,1041
  rectangle net GND: 394,201 426,341
  rectangle net GND: -74,311 426,337
  rectangle net VUSB: 459,302 500,464
  rectangle net VBAT: 1226,427 1342,458
  rectangle net VBAT: 1226,442 1268,721
  rectangle net GND: 394,-48 581,209
  rectangle net GND: 573,161 975,197
  region net GND: 975,197 926,197 926,-48 975,-48
  rectangle net VCC_3V3: 898,998 917,1066
  rectangle net VCC_3V3: 898,941 1077,1004
  rectangle net VUSB: 1046,465 1115,517
  rectangle net GND: 890,265 1059,281
  rectangle net GND: 998,265 1059,333
  rectangle net GND: 1029,265 1375,419
  rectangle net 24V: 193,964 250,1104
  rectangle net GND: 1004,635 1161,707
  rectangle net VUSB: 1004,583 1132,619
  rectangle net GND: 467,1195 605,1290
  rectangle net 24V: 702,1305 733,1345
  rectangle net CII#: 615,1198.99 729,1290
  rectangle net VBAT: 615,1164.5 782,1191
  rectangle net "IPK SNS#": 700,1096 729,1154
  rectangle net "IPK SNS#": 615,1133 729,1154
  rectangle net NetR1_2: 615,1096 690,1123
  rectangle net NetSB6_2: 921,539 1056,569
  rectangle net GND: 792,520 841,569
  rectangle net GND: 890,265 909,469
  rectangle net GND: 1355,501 1482,682
  rectangle net NetC14_1: 1285,546 1342,647
  rectangle net NetC14_1: 1318,604 1342,682
  rectangle net SNS: 831,587 905,633
  rectangle net VCC_3V3: 331,504 393,547
  rectangle net VCC_3V3: 360,508 393,585
  region net GND: 375,840 375,706 462,706 462,840
  rectangle net PMODE: 373,858 456,966
  rectangle net VUSB: 422,455 500,525
  rectangle net VUSB: 212,455 474,497
  rectangle net GND: 1089,920 1129,1142
  rectangle net VTSB: 848,265 883,352
  rectangle net NetQ1_2: 602,653 678,792
  rectangle net SNS_: 548,412 588,787
  rectangle net NetSB4_2: 519,351 670,391
  rectangle net NetSB2_2: 519,301 663,341
  rectangle net VUSB: 591,207 715,292
  rectangle net TS_: 494,220 582,291
  rectangle net NetSB5_2: 255,408 370,438

## Silkscreen, mask and mechanical layers (free items; w line width, h text height)
Top Overlay:
  lines w10: 1231,376 1231,341 1231,334 1246,319 ; 1303.5,447 1336.5,447 ; 1337.5,447 1349.5,435 1349.5,374
  text "CLK_OUT" at 1077,1430.59 h60
  text "GND" at 781,1423.7 h60
Bottom Overlay:
  lines w10: 360,542 403,542 ; 487,140 512,140 515,143 541,169 541,208 552,219 ; 878,169 896,169 903,176 903,308
Mechanical 2:
  lines w10: -86.8,-86.8 384.2,-86.8 607,-86.8 607,136 913,136 913,-86.8 1168.8,-86.8 1488,-86.8 1488,1488 -86.8,1488 -86.8,-86.8

## Dimensions
-86.8,1488 to -86.8,-86.8 on Mechanical 1
-86.8,1488 to 1488,1488 on Mechanical 1